# Altium PCB USB_Extension.PcbDoc
Units mil, origin at the board's own origin, x right, y up, seen from the top; angles counter-clockwise.
Board outline 1300 x 950 mil, 2 copper layers (Top Layer, Bottom Layer), stack 57 mil thick; 5 components, 4 nets, 14 pads, 1 vias.
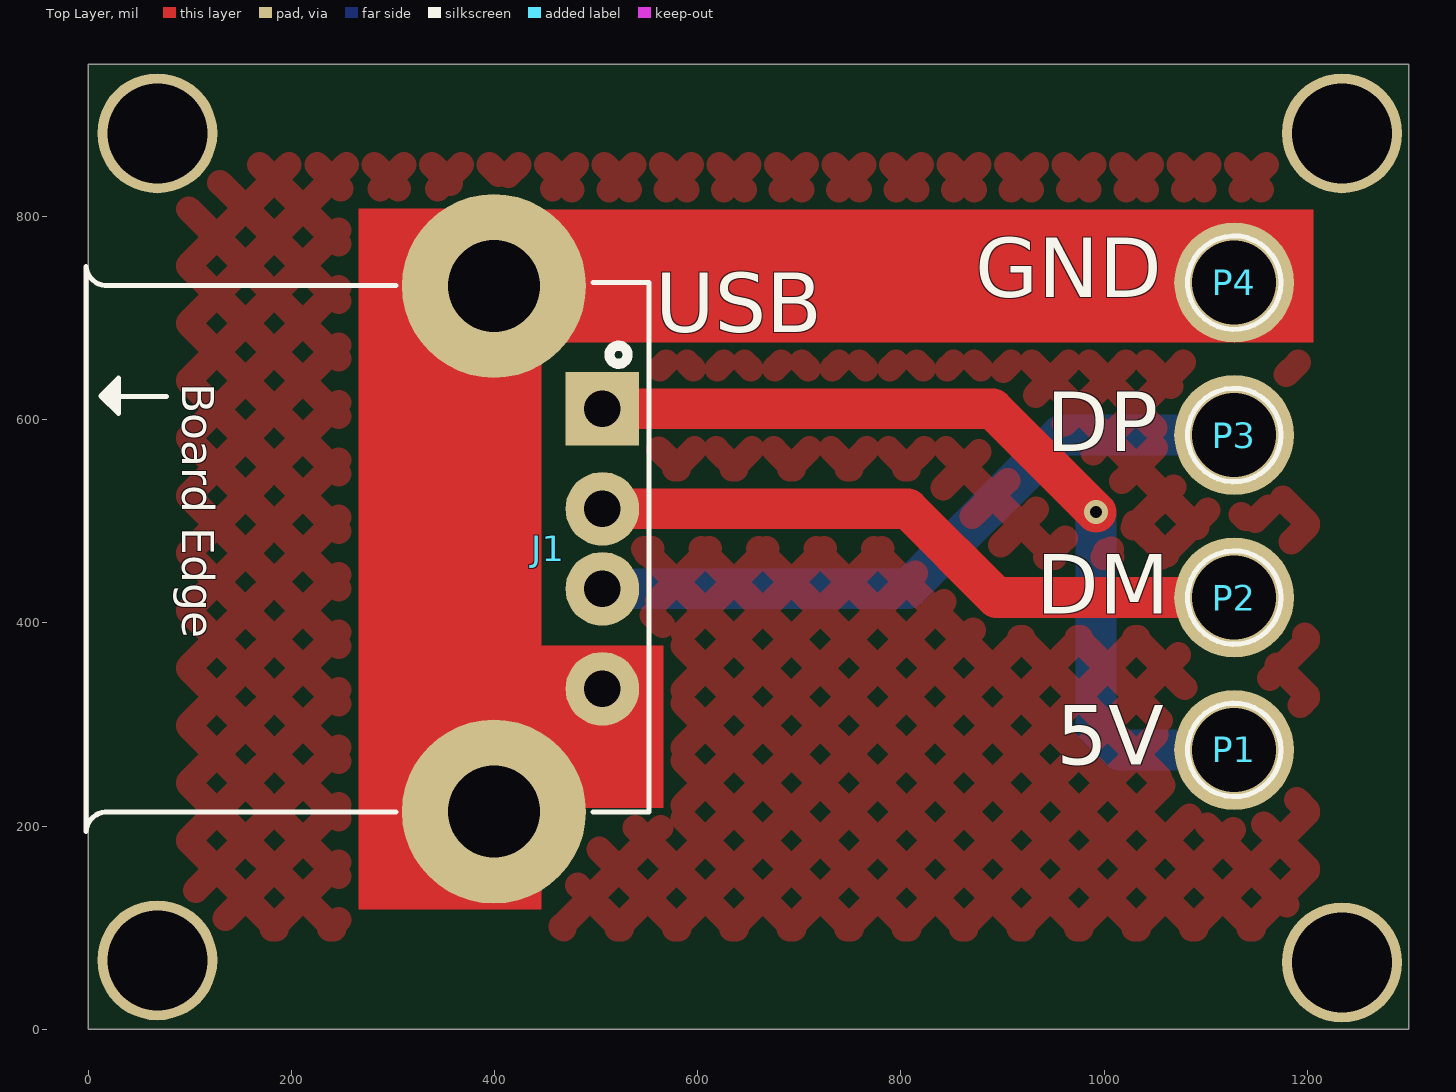
[diagram p0: Top Layer view]
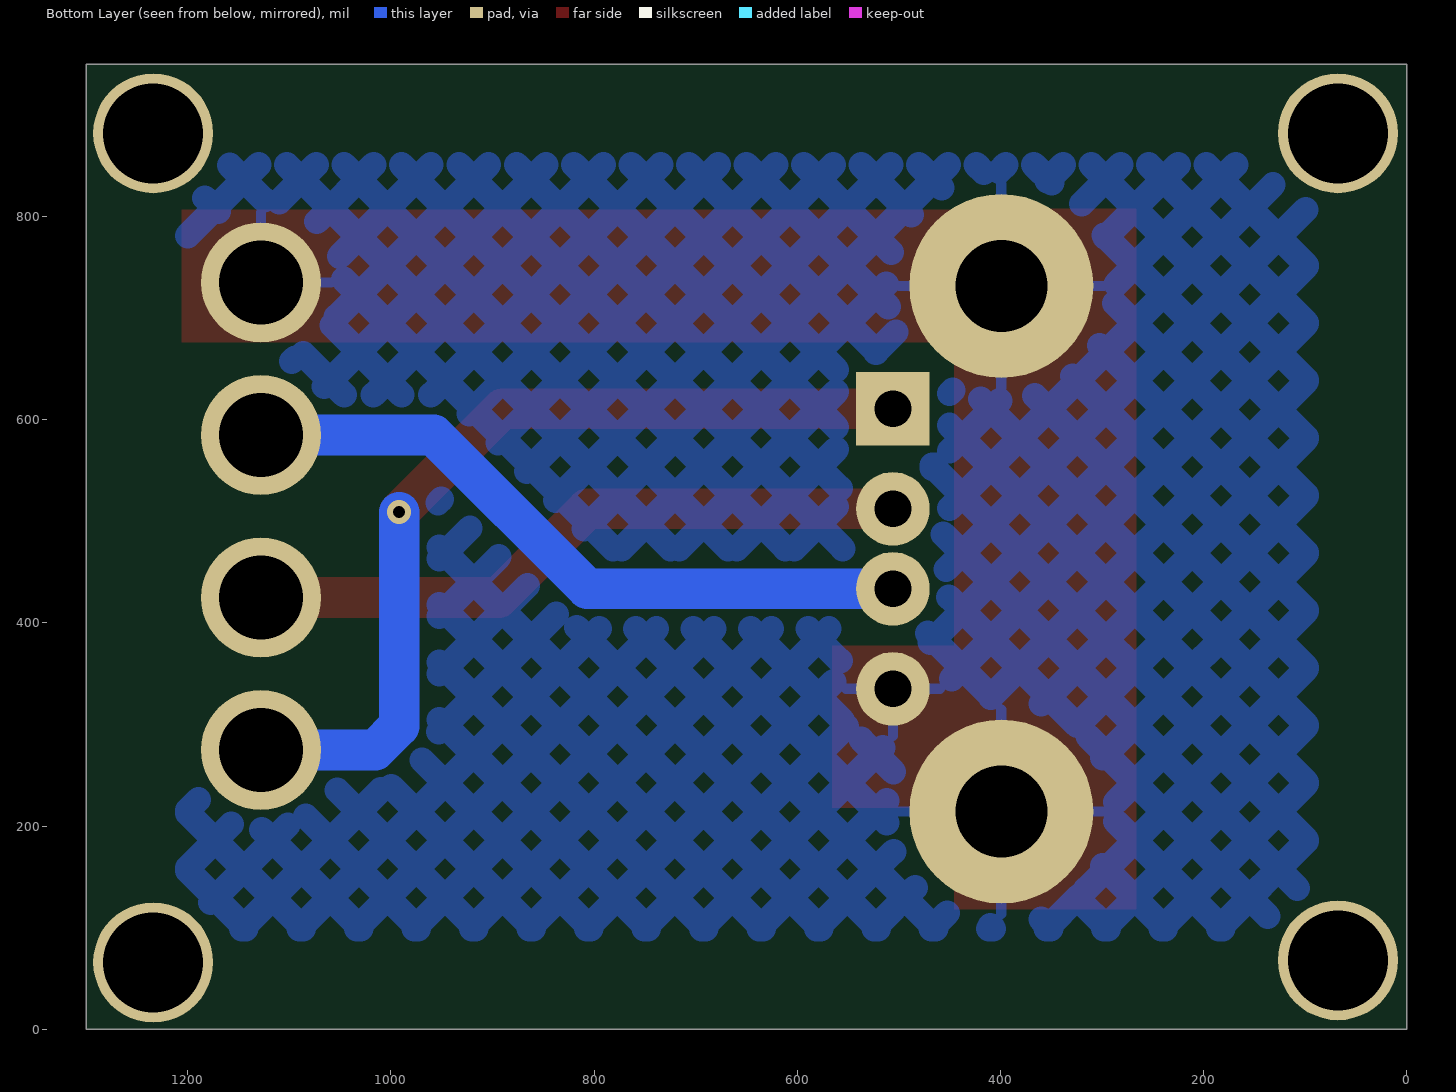
[diagram p1: Bottom Layer view, seen from below]

## Layer stack, top to bottom
Top Solder: solder mask 3, Solder Resist, Dk 3.5
Top Layer: signal copper 10
Dielectric 1: dielectric 37, FR-4, Dk 4.8
Bottom Layer: signal copper 10
Bottom Solder: solder mask 3, Solder Resist, Dk 3.5

## Board outline
0,0 0,950 1300,950 1300,0

## Design rules (kind name [scope] priority, off if disabled: settings)
Clearance [All] p1: gap=7 ignorepadtopadclearanceinfootprint=FALSE except(0: Arc-Hole Track-Hole SMDPad-Hole THPad-Hole Via-Hole Fill-Hole Poly-Hole Region-Hole Text-Hole; 4: Arc-SMDPad Track-SMDPad SMDPad-SMDPad; 6: Arc-THPad Track-THPad SMDPad-THPad THPad-THPad)
HoleToHoleClearance [All] p1: gap=0 allowstackedmicrovias=TRUE
MinimumSolderMaskSliver [All] p1: minsoldermaskwidth=0
PolygonConnect [All] p1: connectstyle=Relief reliefconductorwidth=10 reliefentries=4 polygonreliefangle="90 Angle" airgapwidth=10
RoutingVias [All] p1: holewidth=11.81 width=23.62 viastyle="Through Hole" minholewidth=11.81 minwidth=23.62 maxholewidth=11.81 maxwidth=23.62
SilkToSilkClearance [All] p1: silktosilkclearance=0
SilkToSolderMaskClearance [IsPad] p1: minsilkscreentomaskgap=0 clearancetoexposedcopper=TRUE
SolderMaskExpansion [All] p1: expansion=4 istentingtop=FALSE
Width [All] p1: maxlimit=40 minlimit=10 preferedwidth=22
26 further rules are at their usual default settings.

## Components (designator, comment, footprint, x,y, rotation, side; value= is the part's Value field where it differs from the comment)
J1 "61400416021" 61400416021 506,473 r270 top
P1 "" "TEST POINT" 1128,275 r0 top
P2 "" "TEST POINT" 1128,425 r0 top
P3 "" "TEST POINT" 1128,585 r0 top
P4 "" "TEST POINT" 1128,735 r0 top

## Footprints (in the part's own frame and the unit in brackets; to place one, negate y for a bottom-side part, rotate by r counter-clockwise, add the part's x,y. Pads: shape width x height; smd on the part's side, far side on the other; paste and mask are expansions set on the pad)
61400416021 [mm]
  rect 1.84x1.84 hole 0.92: 1(-3.5,0)
  round 1.84 hole 0.92: 2(-1,0) 3(1,0) 4(3.5,0)
  round 4.6 hole 2.3: MH1(6.57,-2.71) MH2(-6.57,-2.71)
  silkscreen extent -7.06,-12.9 7.06,1.17, body extent -8.05,-12.92 7.95,1.08, height 7.93
"TEST POINT" [mm]
  round 3 hole 2.1: 1(0,0)
  silkscreen extent -1.16,-1.17 1.17,1.17

## Part data
J1: "CONN RCPT USB2.0 TYPEA 4POS R/A", Color=White, Current Rating=1A, Flammability Rating="UL94 V-0", Insulation Resistance=1GR, Manufacturer="Wurth Electronics", Max Operating Temperature=105°C, Min Operating Temperature=-40°C, Package Quantity=60, Supplier Part Number 1=732-2106-ND, Voltage Rating=30V, ComponentLink1Description=https://www.distrelec.biz/Web/Downloads/he/et/4257096_eng_datasheet.pdf?mime=application%2Fpdf&src-supplier=Distrelec, ComponentLink1URL=https://www.distrelec.biz/Web/Downloads/he/et/4257096_eng_datasheet.pdf?mime=application%2Fpdf&src-supplier=Distrelec, ComponentLink2Description=http://www.farnell.com/datasheets/1712150.pdf?src-supplier=Element14, ComponentLink2URL=http://www.farnell.com/datasheets/1712150.pdf?src-supplier=Element14, ComponentLink3Description=http://www.farnell.com/datasheets/1712150.pdf?src-supplier=Newark, ComponentLink3URL=http://www.farnell.com/datasheets/1712150.pdf?src-supplier=Newark, ComponentLink4Description=http://katalog.we-online.de/kataloge/eican/media/pdf/61400416021.pdf?src-supplier=Mouser, ComponentLink4URL=http://katalog.we-online.de/kataloge/eican/media/pdf/61400416021.pdf?src-supplier=Mouser, ComponentLink5Description=https://katalog.we-online.de/em/datasheet/61400416021.pdf?src-supplier=Digi-Key, ComponentLink5URL=https://katalog.we-online.de/em/datasheet/61400416021.pdf?src-supplier=Digi-Key, ComponentLink6Description=http://documents.rs-components.com/techlib://itc_doclist_GB.htm?stockno=7480863&src-supplier=RSComponents, ComponentLink6URL=http://documents.rs-components.com/techlib://itc_doclist_GB.htm?stockno=7480863&src-supplier=RSComponents, ComponentLink7Description=http://www.produktinfo.conrad.com/datenblaetter/1000000-1099999/001088207-da-01-en-WR_COM_USB_TYP_A__61400416021.pdf?src-supplier=Conrad, ComponentLink7URL=http://www.produktinfo.conrad.com/datenblaetter/1000000-1099999/001088207-da-01-en-WR_COM_USB_TYP_A__61400416021.pdf?src-supplier=Conrad, Connector Type=USB, Contact Material="Copper Alloy", Contact Plating=Gold, Gender=Receptacle, Lead Free="Lead Free", Length=15.8mm, Manufacturer Part Number=61400416021, Mount="Through Hole,Horizontal", Number of Contacts=4, Number of Ports=1, Number of Positions=4, Orientation="Right Angle", Packaging=Tray, Pricing 1="1=0.99, 10=0.874, 50=0.823, 100=0.739, 250=0.672 (USD)", REACH SVHC=Unknown, Series=WR-COM, Stock 1=7748, Supplier 1=Digi-Key, Termination=Solder, USB Standard="USB 2.0", Width=14.4mm
P1 P2 P3 P4: library part "TEST POINT", "Test Point ON"

## Free pads (board coordinates)
  round 118.11 hole 98.43: MH1(68,68) MH2(68,882) MH3(1234,882) MH4(1234,66)

## Via types
v1: diameter 23.62, hole 11.81, Top Layer to Bottom Layer, 1 vias

## Nets (pads, with @x,y where several pads share a name; then routed paths per layer and width w, separated by ;. In a path a pad name is that pad's centre, name@x,y a point inside that pad or via, vN(x,y) a via of type N, cw(c..) or ccw(c..) an arc to the next point about the centre after c; other vN are vias at no path point)
DM: J1.2 P2.1 | length 658.2
  Top Layer w40: J1.2 806.63,512.37 894,425 P2.1
DP: J1.3 P3.1 | length 684.7
  Bottom Layer w40: J1.3 806.63,433.63 958,585 P3.1
GND: J1.4 J1.MH1 J1.MH2 P4.1
VCC_5V: J1.1 P1.1 | length 884.4
  Top Layer w40: J1.1 890.2,610.8 v1(992,509)
  Bottom Layer w40: v1(992,509) 992,298.43 1015.43,275 P1.1

## Polygon pours and split planes (outlines as drawn)
no net on Top Layer "polygon_1" (hatched 45Degree grid 40 track 25, remove dead copper, pour order 1): 99,851 99,99 1201,99 1200,100 1200,851
GND on Bottom Layer "polygon_2" (hatched 45Degree grid 40 track 25, remove dead copper, pour order 0): 99,851 99,99 1201,99 1200,100 1200,851

## Other copper
Top Layer:
  rectangle net GND: 267,676 1206,807
  region net GND: 566,378 276,378 276,218 566,218
  region net GND: 446,808 266,808 266,118 446,118

## Silkscreen, mask and mechanical layers (free items; w line width, h text height)
Top Overlay:
  text "GND" at 873,701.17 h100
  text "USB" at 558,667.17 h100
  text "DP" at 943,550 h100
  text "DM" at 933,390 h100
  text "5V" at 953,241.17 h100
Mechanical 2:
  the board outline again, w10

## Dimensions
0,950 to 0,0 on Mechanical 1
0,950 to 1300,950 on Mechanical 1

## Text inside footprints (layer, text, board x,y; h text height)
J1: Top Overlay "Board Edge" at 92.5,636 h31.5 r270